# Altium PCB DB42.PcbDoc (part 3 of 8)
Units mil, origin at the board's own origin, x right, y up, seen from the top; angles counter-clockwise.
Board outline 3236.22 x 4456.69 mil, 8 copper layers (Top Layer, MidLayer1, MidLayer2, GND-Layer5, MidLayer3, VCC, MidLayer4, Bottom Layer), stack 62.194 mil thick; 214 components, 470 nets, 1802 pads, 1663 vias.
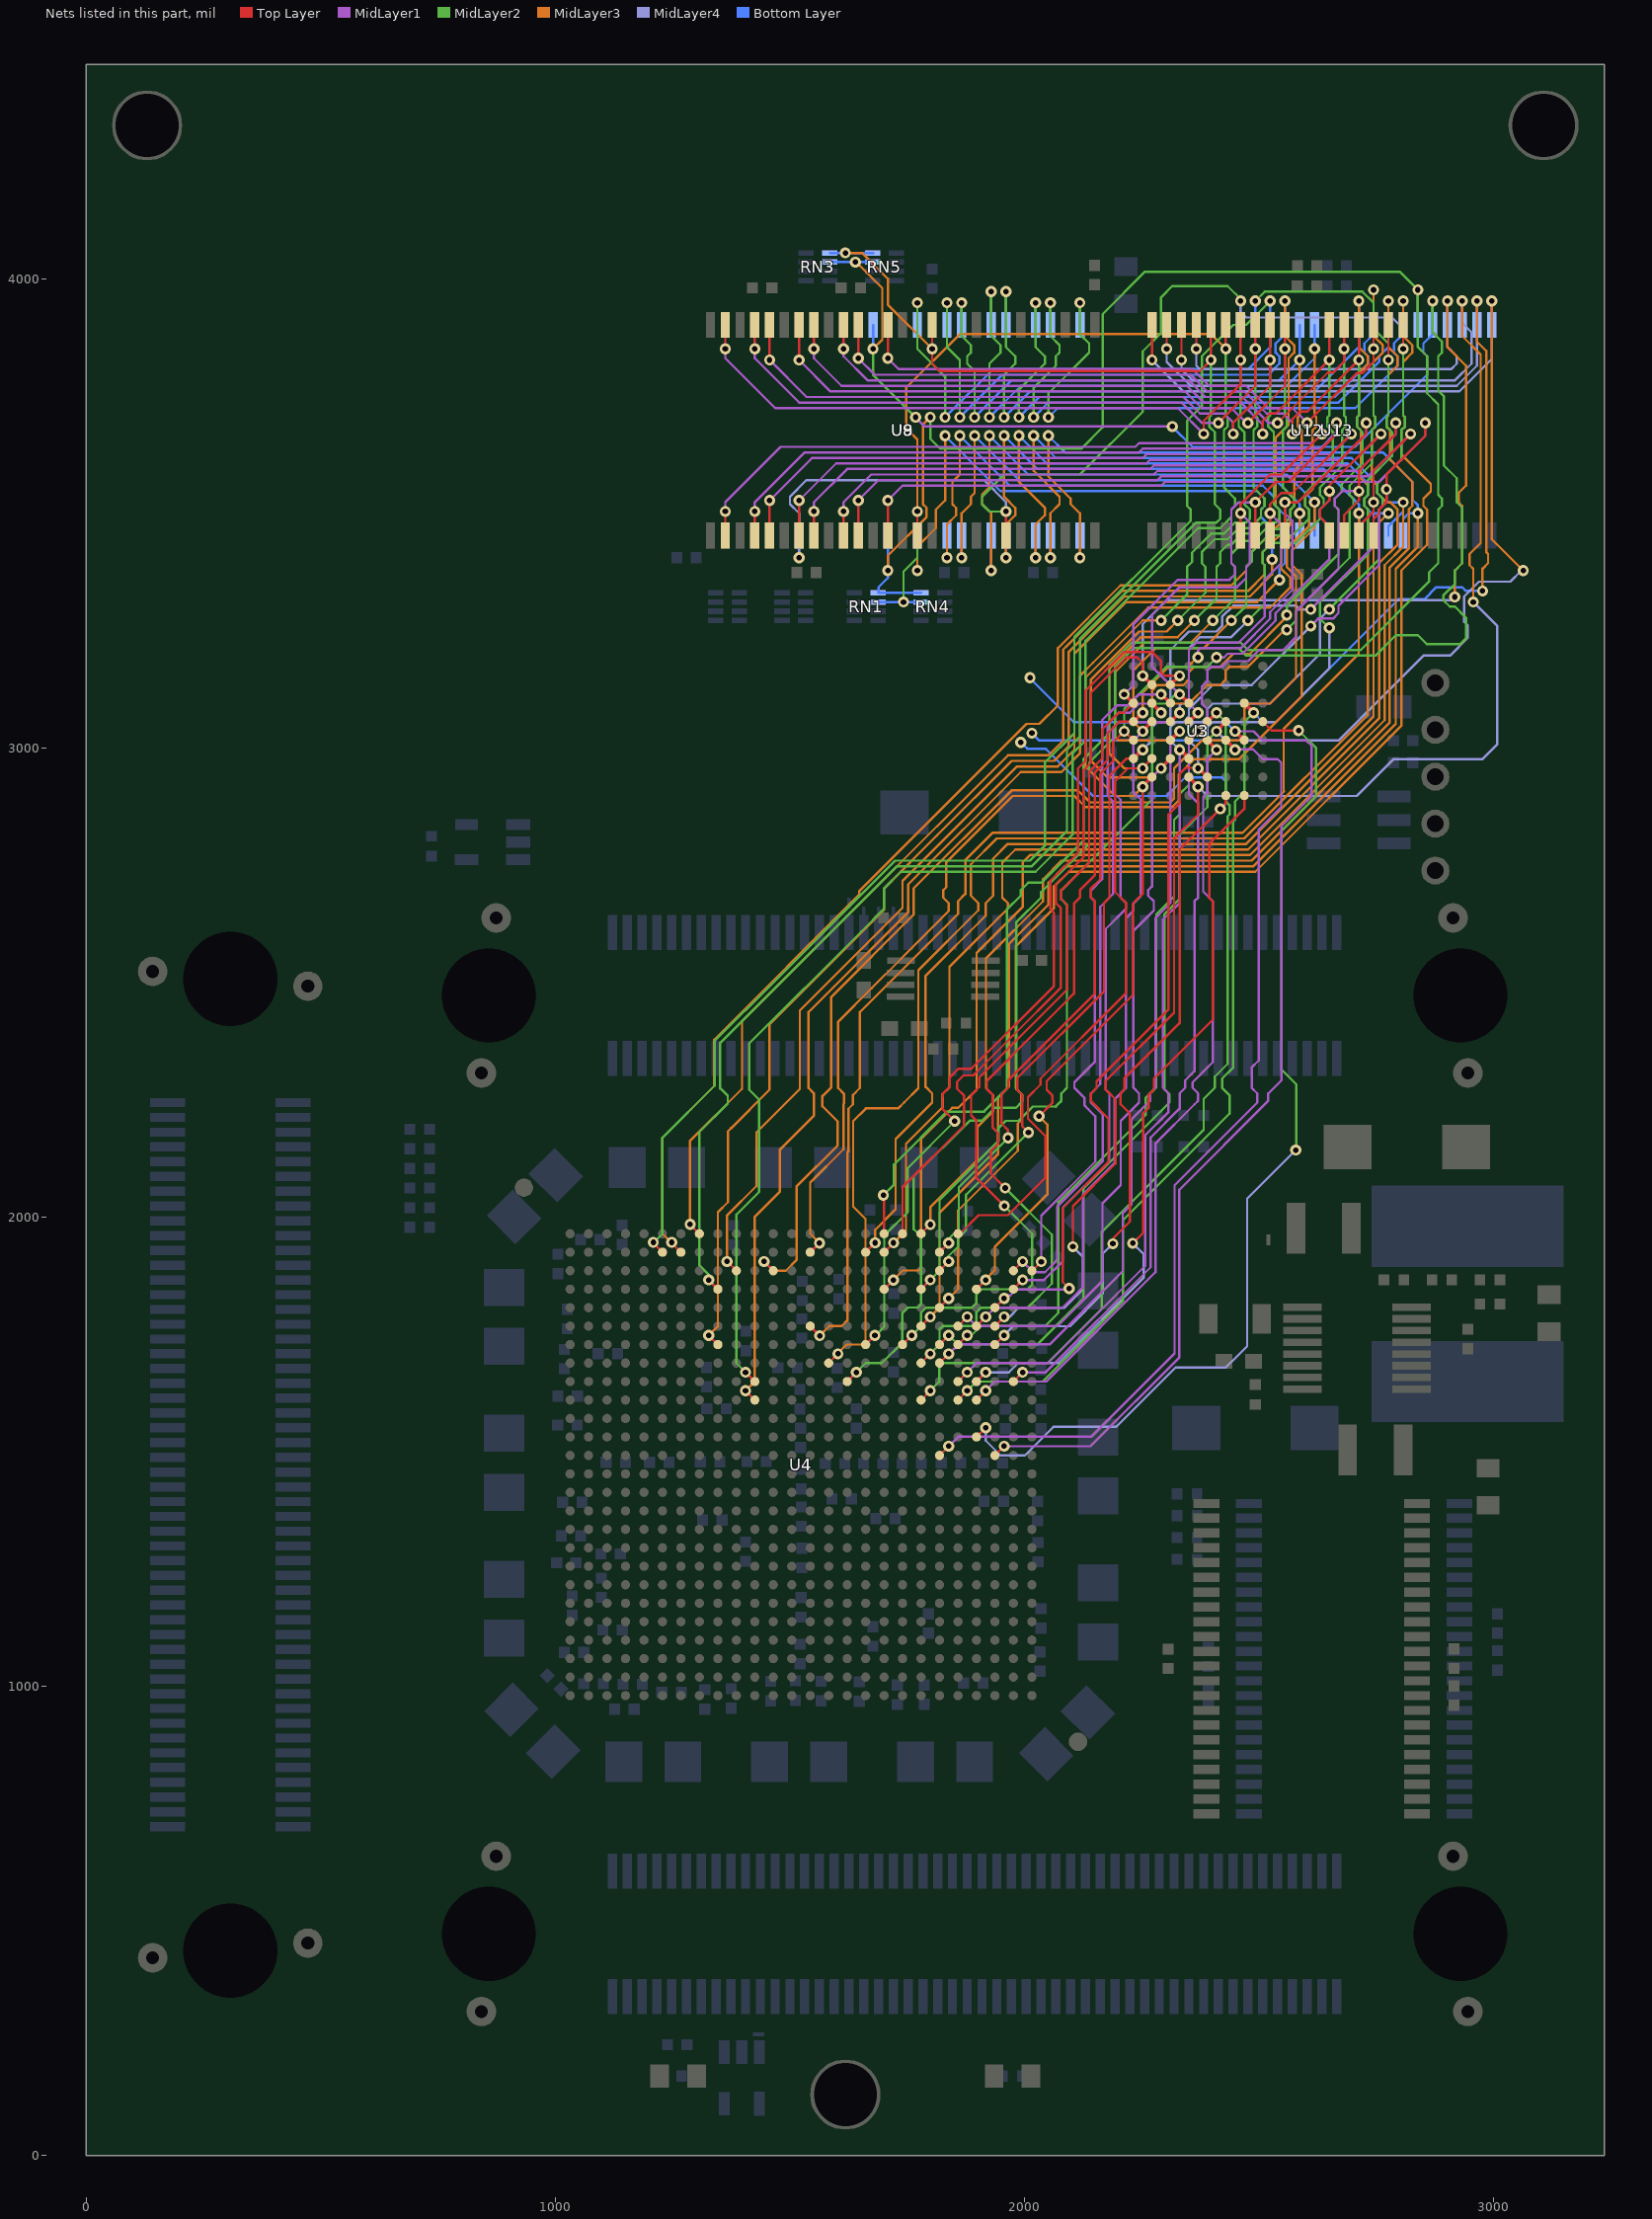
[diagram p9: the nets of this part, all layers, seen from the top]

## Via types
v1: diameter 23.62, hole 11.81, Top Layer to Bottom Layer, 1081 vias
v2: diameter 23.62, hole 11.81, Top Layer to Bottom Layer, tented both sides, 466 vias
v3: diameter 27.56, hole 15.75, Top Layer to Bottom Layer, 116 vias

## Nets (pads, with @x,y where several pads share a name; then routed paths per layer and width w, separated by ;. In a path a pad name is that pad's centre, name@x,y a point inside that pad or via, vN(x,y) a via of type N, cw(c..) or ccw(c..) an arc to the next point about the centre after c; other vN are vias at no path point) (continued)
BUS_A16: U3.D7 U4.E24 U8.21 U9.21 U12.27 U13.27 | length 4892.7
  Top Layer w5: U4.E24@1937.01,1807.09 v1(1956.69,1826.77) ; U8.21@1960.63,3452.76 v2(1960.63,3503.93) ; v1(2095,1848) 2081.5,1861.5 2081.5,2019.5 2179,2117.01 2179,2209.77 2141.73,2247.03 2141.73,2263.78 2153.54,2275.59 2153.54,2289.37 2307.09,2442.91 2307.09,2858.27 2330.71,2881.89 2330.71,2944.88 2343.51,2957.68 v1@2370.08,2957.68 ; v2(2807.09,3850.39) U12.27@2807.09,3901.57
  Top Layer w7.87: v1@2370.57,2957.19 U3.D7@2389.76,2937.99
  MidLayer1 w5: v1(1956.69,1826.77) 1963.11,1833.19 1969.97,1833.19 1982.86,1846.08 2092.88,1846.08 v1@2092.98,1845.98
  MidLayer2 w5: v2(1960.63,3503.93) 1925.2,3503.93 1909.45,3519.68 1909.45,3535.43 1925.2,3551.18 1956.69,3582.68 2118.11,3582.68 2251.97,3716.54 2251.97,3845.28 2291.34,3884.64 2291.34,3960.63 2314.96,3984.25 2433.07,3984.25 2460.63,3956.69 v2(2460.63,3952.76) ; v1(2649.61,3295.28) 2755.91,3401.57 2755.91,3507.87 2763.78,3515.75 2763.78,3531.5 2751.97,3543.31 2751.97,3562.99 2803.15,3614.17 2803.15,3677.17 2811.02,3685.04 2811.02,3704.72 2807.09,3708.66 v2(2807.09,3850.39)
  MidLayer4 w5: v2(1519.68,3405.51) 1519.68,3500 1500,3519.68 1500,3535.43 1535.43,3570.87 1913.38,3570.87 1960.63,3523.63 v2(1960.63,3503.93) ; v1(2370.08,2956.69) 2370.08,2996.06 2350.39,3015.75 2350.39,3043.31 2362.2,3055.12 2377.95,3055.12 2389.76,3066.93 2389.76,3082.68 2401.57,3094.49 2523.62,3094.49 2629.92,3200.79 2629.92,3275.59 v1(2649.61,3295.28) ; v2(2460.63,3952.76) 2460.63,3929.13 2472.44,3917.32 2783.46,3917.32 2807.09,3893.7 v2(2807.09,3850.39)
  Bottom Layer w5: v2(1519.68,3405.51) U9.21@1519.69,3452.76 ; U13.27@2460.63,3901.57 v2(2460.63,3952.76)
BUS_A17: U3.E7 U4.F24 U12.42 U13.42 | length 4073.9
  Top Layer w5: U4.F24@1937.01,1767.72 v1(1956.69,1787.4) ; v1(2103.15,1937.01) 2103.15,2023.32 2194,2114.17 2194,2250.88 2179.92,2264.97 2172.82,2272.06 2172.82,2289.76 2318.9,2435.84 2318.9,2807.09 2370.08,2858.27 v1(2370.08,2917.32) ; v2(2334.64,3826.77) U12.42@2334.64,3901.57
  Top Layer w7.87: U3.E7@2350.39,2937.99 v1(2370.08,2917.32)
  MidLayer3 w5: v2(2933.07,3952.76) 2933.07,3877.95 2972.44,3838.58 2972.44,3437.01 2948.82,3413.39 2948.82,3389.76 2956.69,3381.89 v1(2956.69,3311.02)
  MidLayer4 w5: v1(1956.69,1787.4) 1968.5,1787.4 1987.98,1806.88 2085.23,1806.88 2124.41,1846.06 2124.41,1915.75 v1(2103.15,1937.01) ; v2(2334.64,3826.77) 2334.64,3807.09 2358.27,3783.46 2917.32,3783.46 2952.76,3818.9 2952.76,3885.83 2933.07,3905.51 v2(2933.07,3952.76) ; v1(2370.08,2917.32) 2389.76,2897.64 2708.27,2897.64 2787.01,2976.38 2976.38,2976.38 3007.87,3007.87 3007.87,3259.84 v1(2956.69,3311.02)
  Bottom Layer w5: U13.42@2933.07,3901.57 v2(2933.07,3952.76)
BUS_A18: U3.B3 U4.K22 U12.43 U13.43 | length 4068.5
  Top Layer w5: U4.K22@1858.27,1610.24 v1(1877.95,1629.92) ; v2(2303.15,3850.39) U12.43@2303.15,3901.57
  Top Layer w7.87: U3.B3@2468.5,3095.47 v1@2488.19,3075.79
  MidLayer2 w5: v1(1877.95,1629.92) 1897.64,1649.61 2038.29,1649.61 2210.06,1821.38 2210.06,1993.58 2437.01,2220.53 2437.01,2259.84 2421.26,2275.59 2421.26,2295.28 2444.88,2318.9 2444.88,2673.23 2444.88,2842.52 2448.82,2846.46 2448.82,2885.83 2468.5,2905.51 2468.5,2976.38 2468.5,3055.12 v1(2488.19,3074.8)
  MidLayer3 w5: v2(2964.57,3952.76) 2964.57,3866.14 2984.25,3846.46 2984.25,3417.32 2988.19,3413.39 2988.19,3393.7 2976.38,3381.89 v1(2976.38,3334.65)
  MidLayer4 w5: v2(2303.15,3850.39) 2303.15,3822.83 2354.33,3771.65 2921.26,3771.65 2964.57,3814.96 v2(2964.57,3952.76)
  Bottom Layer w5: v1(2488.19,3074.8) 2507.87,3055.12 2535.43,3055.12 2796.99,3316.68 2852.11,3316.68 2877.95,3342.52 2933.07,3342.52 2940.94,3334.65 v1(2976.38,3334.65) ; U13.43@2964.57,3901.57 v2(2964.57,3952.76)
BUS_A19: U3.C4 U4.G21 U12.44 U13.44 | length 4235
  Top Layer w5: U4.G21@1818.9,1728.35 v1(1838.58,1748.03) ; v2(2271.65,3826.77) U12.44@2271.65,3901.57
  Top Layer w7.87: v1(2409.45,3035.43) U3.C4@2429.13,3056.1
  MidLayer2 w5: v1(1838.58,1748.03) 1858.27,1728.35 2027.48,1728.35 2125.44,1826.3 2125.44,2060.5 2309.45,2244.5 2309.45,2261.23 2298.62,2272.06 2298.62,2645.98 2330.71,2678.06 2330.71,2814.96 2389.76,2874.02 2389.76,3015.75 v1(2409.45,3035.43)
  MidLayer3 w5: v2(2996.06,3952.76) 2996.06,3633.86 2996.06,3444.88 v1(3062.99,3377.95)
  MidLayer4 w5: v2(2271.65,3826.77) 2338.58,3759.84 2926.67,3759.84 2996.06,3829.23 v2(2996.06,3952.76) ; v1(2409.45,3035.43) 2429.13,3015.75 2669.29,3015.75 2850.39,3196.85 2906.85,3196.85 2944.88,3234.88 2944.88,3260.83 2937.01,3268.7 2937.01,3322.83 2968.5,3354.33 3035.43,3354.33 3059.06,3377.95 v1(3062.99,3377.95)
  Bottom Layer w5: U13.44@2996.06,3901.57 v2(2996.06,3952.76)
BUS_A20: U3.D5 U4.K23 U12.28 U13.28 | length 3357.9
  Top Layer w5: U4.K23@1897.64,1610.24 v1(1917.32,1629.92) ; v2(2775.59,3826.77) U12.28@2775.59,3901.57
  Top Layer w7.87: U3.D5@2389.76,3016.73 v1(2409.45,2996.06)
  MidLayer1 w5: v1(1917.32,1629.92) 1937.01,1649.61 2046.16,1649.61 2279.03,1882.48 2279.03,2156.98 2362.44,2240.4 2370.08,2248.03 2370.08,2263.78 2358.27,2275.59 2358.27,2287.4 2401.57,2330.71 2401.57,2673.23 2380.91,2693.9 2380.91,2894.69 2389.76,2903.54 2389.76,2976.38 v1(2409.45,2996.06)
  MidLayer2 w5: v2(2492.13,3952.76) 2511.81,3972.44 2720.47,3972.44 2744.09,3948.82 2744.09,3893.7 2775.59,3862.21 v2(2775.59,3826.77) 2775.59,3708.66 2771.65,3704.72 2771.65,3685.04 2783.46,3673.23 2783.46,3622.05 2732.28,3570.87 2732.28,3539.37 2724.41,3531.5 2724.41,3515.75 2732.28,3507.87 2732.28,3413.39 2629.92,3311.02 2629.92,3275.59 v1(2649.61,3255.91)
  MidLayer4 w5: v1(2409.45,2996.06) 2389.76,3015.75 2389.76,3043.31 2401.57,3055.12 2535.43,3055.12 2649.61,3169.29 v1(2649.61,3255.91)
  Bottom Layer w5: U13.28@2492.13,3901.57 v2(2492.13,3952.76)
BUS_A21: U3.D4 U4.K20 | length 1904.6
  Top Layer w5: U4.K20@1779.53,1610.24 v1(1799.21,1629.92)
  Top Layer w7.87: U3.D4@2389.76,3056.1 v1(2409.45,3074.8)
  MidLayer2 w5: v1(1799.21,1629.92) 1818.52,1649.23 1818.52,1678.76 1828.74,1688.98 2049.21,1688.98 2164.65,1804.41 2164.65,1968.7 2381.89,2185.95 2381.89,2251.97 2405.51,2275.59 2405.51,2299.21 2433.07,2326.77 2433.07,2749.01 2433.07,2854.33 2437.01,2858.27 2437.01,2877.95 2429.13,2885.83 2429.13,2909.45 2429.13,3055.12 v1(2409.45,3074.8)
BUS_A22: U3.C5 U4.N21 | length 2538.3
  Top Layer w5: U4.N21@1818.9,1492.13 v1(1838.58,1511.81)
  Top Layer w7.87: U3.C5@2429.13,3016.73 v1@2448.82,2997.05
  MidLayer1 w5: v1(1838.58,1511.81) 1858.64,1531.87 2142.08,1531.87 2319.88,1709.67 2319.88,2067.91 2496.06,2244.09 2496.06,2263.78 2484.25,2275.59 2484.25,2318.9 2499.36,2334.01 2499.36,2826.05 2547.24,2873.93 2547.24,2968.5 2539.37,2976.38 2507.87,2976.38 2487.2,2997.05 v1@2448.82,2997.05
  Bottom Layer w5: v1(2015.75,3031.5) 2031.5,3015.75 2429.13,3015.75 v1@2447.83,2997.05
  other v1: 2448.82,2996.06
BUS_A23: U3.B8 U4.J23 | length 1604.7
  Top Layer w5: U4.J23@1897.64,1649.61 v1(1917.32,1669.29) ; v1(2230.73,1944.38) 2253.36,1967.02 2253.36,2221.36 2255,2223 ; 2254.75,2223.25 2264.96,2233.46 2264.96,2261.02 2275.59,2271.65 2275.59,2295.27 2401.57,2421.26 2401.57,2673.23 2393.7,2681.1 2393.7,2731.56 ; 2393.7,2716.54 2393.7,2795.28 2468.51,2870.08 U3.B8@2468.5,2898.62
  MidLayer4 w5: v1@1918.3,1669.29 1966.93,1669.29 1986.72,1689.08 2072.15,1689.08 2254.44,1871.37 2254.44,1920.67 v1(2230.73,1944.38)
BUS_A24: U3.C8 U4.G24 | length 2027.6
  Top Layer w5: U4.G24@1937.01,1728.35 v1(1956.69,1748.03) ; v1@2189.4,1944.38 2189.4,1955.21 2224.82,1990.63 2224.82,2220.74 2205,2240.57 2205,2264.05 2212.8,2271.85 2212.8,2295.47 2330.71,2413.39 2330.71,2783.46 2429.14,2881.89 U3.C8@2429.13,2898.62
  MidLayer4 w5: v1(1956.69,1748.03) 1956.69,1748.27 1975.91,1767.48 2096.62,1767.48 2166.54,1837.4 2166.54,1921.52 v1(2188.42,1943.4)
  Bottom Layer w5: v1(1992.13,3011.81) 2006.09,2998.31 2045.43,2998.31 2146.1,2897.64 2303.15,2897.64 2342.52,2937.01 2421.26,2937.01 2429.13,2929.13 2429.13,2881.89 v1(2417.32,2870.08)
BUS_D0: U3.E3 U4.D20 U8.2 U12.7 | length 3891.2
  Top Layer w5: U8.2@1362.21,3452.76 v2(1362.2,3503.93) ; U4.D20@1779.53,1846.46 v1(1799.21,1866.14) ; U12.7@2460.63,3452.76 v1(2460.63,3500) 2460.63,3519.69 2523.62,3582.68 2547.24,3582.68 v2(2633.86,3669.29)
  Top Layer w7.87: v1(2330.71,3114.17) U3.E3@2350.4,3095.48
  MidLayer1 w5: v2(1362.2,3503.93) 1362.2,3523.62 1480.31,3641.73 2236.22,3641.73 2244.09,3649.61 2614.17,3649.61 v2(2633.86,3669.29) ; v1(2330.71,3114.17) 2271.65,3173.23 2271.65,3283.46 2330.71,3342.52 2452.76,3342.52 2472.44,3362.2 2472.44,3385.83 2480.31,3393.7 2480.31,3480.32 v1(2460.63,3500)
  MidLayer2 w5: v1(1799.21,1866.14) 1818.9,1885.83 1818.9,2036.73 1944.38,2162.21 1944.38,2189.4 1960.13,2205.14 1987.68,2205.14 2018.18,2235.65 2066.4,2235.65 ; 2066.57,2235.47 2077.1,2246 2078.74,2247.64 2078.74,2263.78 2090.55,2275.59 2090.55,2665.35 2078.74,2677.17 2078.74,2696.85 2094.49,2712.6 ; 2084.64,2702.76 2271.65,2889.77 2271.65,3086.61 2279.53,3094.49 2302.17,3094.49 2321.85,3114.17 v1(2330.71,3114.17)
BUS_D1: U3.H3 U4.G19 U8.4 U12.8 | length 4174.9
  Top Layer w5: U8.4@1425.2,3452.76 v2(1425.19,3503.93) ; U4.G19@1740.16,1728.35 v1(1759.84,1748.03) ; v1(1957,2024) 1897,2084 1897,2206 1886.22,2216.78 1886.22,2260.24 1903.54,2277.56 1903.54,2297.64 2090.94,2485.04 2090.94,2664.96 2078.74,2677.17 2078.74,2696.85 2137.8,2755.91 2137.8,2949.54 2165.35,2977.1 2165.35,3039.37 2201.28,3075.3 2212.1,3075.3 U3.H3@2232.29,3095.48 ; U12.8@2492.13,3452.76 v1(2492.13,3523.62) 2535.43,3566.93 2562.99,3566.93 2665.35,3669.29 v2(2665.35,3692.91)
  Top Layer w7.87: v1(2212.6,3114.17) U3.H3@2232.29,3095.48
  MidLayer1 w5: v2(1425.19,3503.93) 1425.19,3523.62 1531.5,3629.92 2244.09,3629.92 2251.97,3637.8 2629.92,3637.8 2665.35,3673.23 v2(2665.35,3692.91) ; v1(2212.6,3114.17) 2232.28,3133.86 2232.28,3263.78 2326.77,3358.27 2437.01,3358.27 2448.82,3370.08 2448.82,3385.83 2440.94,3393.7 2440.94,3507.87 2456.69,3523.62 v1(2492.13,3523.62)
  MidLayer2 w5: v1(1759.84,1748.03) 1779.53,1767.72 1779.53,1796.46 1790.16,1807.09 1887.8,1807.09 1897.64,1816.93 1897.64,1835.83 1908.27,1846.46 2006.69,1846.46 2016.14,1855.91 2016.14,1964.86 v1(1957,2024)
BUS_D2: U3.E4 U4.G22 U8.5 U12.9 | length 3924.7
  Top Layer w5: U8.5@1456.69,3452.76 v2(1456.69,3527.55) ; U4.G22@1858.27,1728.35 v1(1877.95,1748.03) ; U12.9@2523.62,3452.76 v1(2523.62,3500) 2523.62,3519.69 2547.24,3543.31 2570.87,3543.31 v2(2696.85,3669.29)
  Top Layer w7.87: U3.E4@2350.39,3056.1 v1(2370.08,3074.81)
  MidLayer1 w5: v2(1456.69,3527.55) 1547.24,3618.11 2251.97,3618.11 2259.84,3625.98 2653.54,3625.98 v2(2696.85,3669.29) ; v1(2370.08,3074.81) 2350.39,3094.5 2350.39,3208.66 2366.14,3224.41 2456.69,3224.41 2511.81,3279.53 2511.81,3358.27 2547.24,3393.7 2547.24,3476.38 v1(2523.62,3500)
  MidLayer2 w5: v1(1877.95,1748.03) 1887.01,1748.03 1906.69,1767.71 2043.77,1767.71 2072.3,1796.25 2072.3,2031.96 2258.28,2217.94 2258.28,2254.34 2280.91,2276.98 2280.91,2645.38 2318.9,2683.37 2318.9,2846.46 2330.71,2858.27 2330.71,2901.57 2350.39,2921.26 2350.39,3055.12 v1(2370.08,3074.81)
BUS_D3: U3.H4 U4.H20 U8.7 U12.10 | length 4178.9
  Top Layer w5: U8.7@1519.69,3452.76 v2(1519.68,3527.56) ; U4.H20@1779.53,1688.98 v1(1799.21,1708.66) ; v1(1959,2062) 1928,2093 1928,2141 1943.4,2156.4 1943.4,2179.56 1932.32,2190.64 1932.32,2260.59 1920.08,2272.83 1920.08,2290.55 1970.67,2341.14 ; 1970.47,2341.34 2087.88,2458.75 2105.53,2476.39 2105.53,2668.52 2118.11,2681.1 2118.11,2696.85 2149.61,2728.35 2149.61,2947.21 2177.17,2974.77 2177.17,3031.5 2201.78,3056.11 U3.H4@2232.28,3056.1 ; U12.10@2555.12,3452.76 v1(2555.12,3523.62) 2582.68,3523.62 2640.75,3581.69 2728.35,3669.29 v2(2728.35,3692.91)
  Top Layer w7.87: U3.H4@2232.28,3056.1 v1@2251.47,3075.3
  MidLayer1 w5: v2(1519.68,3527.56) 1598.43,3606.3 2259.84,3606.3 2267.72,3614.17 2673.23,3614.17 2728.35,3669.29 v2(2728.35,3692.91) ; v1(2370.08,3192.91) 2370.08,3208.66 2374.02,3212.6 2460.63,3212.6 2523.62,3275.59 2523.62,3289.73 2571,3337.11 2571,3484.12 2555.12,3500 v1(2555.12,3523.62)
  MidLayer2 w5: v1(1799.21,1708.66) 1799.21,1709.06 1818.9,1728.74 1818.9,1761.02 1825.59,1767.72 1887.4,1767.72 1897.64,1777.95 1897.64,1797.24 1907.48,1807.09 2007.09,1807.09 2058.27,1858.27 2058.27,1962.73 v1(1959,2062)
  MidLayer3 w5: v1(2251.97,3074.8) 2251.97,3118.11 2255.91,3122.05 2307.09,3173.23 2348.06,3173.23 2367.75,3192.91 v1(2370.08,3192.91)
BUS_D4: U3.H5 U4.B21 U8.8 U12.13 | length 3724.4
  Top Layer w5: U8.8@1551.18,3452.76 v2(1551.18,3503.94) ; U4.B21@1818.9,1925.2 v1(1838.58,1944.88) ; v1(1965.05,2168.74) 1965.05,2185.46 1951.18,2199.33 1951.18,2262.2 1965.35,2276.38 1965.35,2291.31 2149.61,2475.56 2149.61,2673.23 2141.73,2681.1 2141.73,2700.79 2161.42,2720.47 2161.42,2944.88 2188.98,2972.44 2188.98,3011.81 v1(2212.6,3035.43) U3.H5@2232.28,3016.73 ; U12.13@2649.61,3452.76 2649.61,3472.44 2629.92,3492.13 2629.92,3507.87 2649.61,3527.56 v1(2649.61,3547.24) 2649.61,3559.06 v2(2759.84,3669.29)
  MidLayer1 w5: v2(1551.18,3503.94) 1551.18,3523.62 1622.05,3594.49 2267.72,3594.49 2275.59,3602.36 2692.91,3602.36 v2(2759.84,3669.29) ; v1(2409.45,3192.91) 2425.2,3192.91 2433.07,3200.79 2464.57,3200.79 2535.43,3271.65 2535.43,3287.4 2649.61,3401.57 2649.61,3472.44 2629.92,3492.13 2629.92,3507.87 2649.61,3527.56 v1(2649.61,3547.24)
  MidLayer2 w5: v1(1838.58,1944.88) 1838.58,1953.54 1860,1974.96 1860,2063.69 v1(1965.05,2168.74) ; v1(2212.6,3035.43) 2212.6,3082.68 2303.15,3173.23 2389.76,3173.23 v1(2409.45,3192.91)
BUS_D5: U3.E5 U4.J25 U8.10 U12.14 | length 4014.6
  Top Layer w5: U8.10@1614.17,3452.76 v2(1614.17,3503.93) ; U4.J25@1976.38,1649.61 v1(1996.06,1669.29) ; U12.14@2681.1,3452.76 2681.1,3496.06 2712.6,3527.56 v1(2712.6,3547.24) 2712.6,3590.55 2791.34,3669.29 v2(2791.34,3692.91)
  Top Layer w7.87: U3.E5@2350.39,3016.73 v1(2370.08,3035.43)
  MidLayer1 w5: v2(1614.17,3503.93) 1614.17,3523.62 1673.23,3582.68 2275.59,3582.68 2283.46,3590.55 2712.6,3590.55 2791.34,3669.29 v2(2791.34,3692.91) ; v1(1996.06,1669.29) 2045.18,1669.29 2268.98,1893.09 2268.98,2169.6 2330.71,2231.32 2330.71,2263.78 2342.52,2275.59 2342.52,2291.34 2362.2,2311.02 2362.2,2673.23 2370.08,2681.1 2370.08,2720.47 ; 2370.08,2704.72 2370.08,2720.47 ; v1(2712.6,3547.24) 2677.17,3547.24 2661.42,3531.5 2661.42,3515.75 2669.29,3507.87 2669.29,3381.89 2578.74,3291.34 2578.74,3236.22 2551.18,3208.66 2500,3208.66 2476.38,3185.04 2433.07,3185.04 2421.26,3173.23 2397.64,3173.23 2389.76,3165.35 2389.76,3141.73 2377.95,3129.92 2377.95,3094.49 2389.76,3082.68 2389.76,3055.12 v1(2370.08,3035.43) 2350.39,3015.75 2350.39,2901.57 2370.08,2881.89 2370.08,2720.47
BUS_D6: U3.H6 U4.C21 U8.11 U12.15 | length 3777.6
  Top Layer w5: U8.11@1645.67,3452.76 v2(1645.66,3527.55) ; U4.C21@1818.9,1885.83 v1(1838.58,1905.51) ; v1(2008.34,2180.54) 1995.28,2193.61 1995.28,2260.63 1984.41,2271.49 1984.41,2296.22 2169.29,2481.1 2169.29,2669.29 2181.1,2681.1 2181.1,2940.94 2217.52,2977.37 U3.H6@2232.28,2977.36 ; U12.15@2712.6,3452.76 2712.6,3472.44 2744.09,3503.94 v1(2744.09,3523.62) 2744.09,3590.55 v2(2822.83,3669.29)
  Top Layer w7.87: U3.H6@2232.28,2977.36 2251.47,2996.56 v1@2251.97,2997.05
  MidLayer1 w5: v2(1645.66,3527.55) 1688.98,3570.87 2283.46,3570.87 2291.34,3578.74 2732.28,3578.74 v2(2822.83,3669.29) ; v1(2610.24,3295.28) 2744.09,3429.13 v1(2744.09,3523.62)
  MidLayer2 w5: v1(1838.58,1905.51) 1838.58,1917.33 1858.27,1937.01 1858.27,1955.12 1865.55,1962.4 ; 1865.75,1962.21 1875.59,1972.05 1875.59,2047.79 v1(2008.34,2180.54)
  MidLayer4 w5: v1(2251.97,2996.06) 2271.65,3015.75 2271.65,3043.31 2283.46,3055.12 2303.15,3055.12 2311.02,3062.99 2311.02,3208.66 2350.39,3248.03 2409.45,3248.03 2421.26,3259.84 2421.26,3279.53 2444.88,3303.15 2578.74,3303.15 2586.61,3295.28 v1(2610.24,3295.28)
BUS_D7: U3.E6 U4.J22 U8.13 U12.16 | length 4110.9
  Top Layer w5: U8.13@1708.66,3452.76 v2(1708.66,3527.55) ; U4.J22@1858.27,1649.61 v1(1877.95,1669.29) ; U12.16@2744.09,3452.76 2744.09,3488.19 2755.91,3500 2755.91,3507.87 2771.65,3523.62 v1(2771.65,3551.18) 2771.65,3582.68 2854.33,3665.35 v2(2854.33,3692.91)
  Top Layer w7.87: v1@2330.71,2997.05 2331.2,2996.56 U3.E6@2350.39,2977.36
  MidLayer1 w5: v2(1708.66,3527.55) 1740.16,3559.06 2291.34,3559.06 2299.21,3566.93 2755.91,3566.93 2854.33,3665.35 v2(2854.33,3692.91) ; v1(1877.95,1669.29) 1897.64,1688.98 2050.1,1688.98 2257.3,1896.17 2257.3,2174.64 2307.09,2224.43 2307.09,2263.78 2295.28,2275.59 2295.27,2633.86 2330.71,2669.29 2330.71,2700.79 ; 2330.71,2681.1 v1(2330.71,2996.06) v1@2330.71,2997.05 ; v1(2610.24,3259.84) 2625.98,3275.59 2657.48,3275.59 2669.29,3287.4 2669.29,3303.15 2755.91,3389.76 2755.91,3507.87 2771.65,3523.62 v1(2771.65,3551.18)
  MidLayer4 w5: v1(2330.71,2996.06) 2311.02,3015.75 2311.02,3043.31 2322.83,3055.12 2338.58,3055.12 2350.39,3066.93 2350.39,3082.68 2401.57,3133.86 2484.25,3133.86 v1(2610.24,3259.84)
BUS_D8: U3.F3 U4.C26 U8.42 U12.29 | length 3791.8
  Top Layer w5: v2(1708.66,3830.71) U8.42@1708.66,3901.57 ; U4.C26@2016.14,1886.22 U4.C26@2016.14,1886.61 ; U4.C26@2016.14,1887.8 U4.C26@2016.14,1886.61 ; v1(2035.83,1905.12) 2017.32,1886.61 U4.C26@2016.14,1886.61 ; v2(2602.36,3692.91) 2708.17,3798.72 2719.98,3798.72 2744.09,3822.83 v2(2744.09,3850.39) U12.29@2744.09,3901.57
  Top Layer w7.87: v1@2291.34,3115.16 2291.83,3114.67 U3.F3@2311.03,3095.48
  MidLayer1 w5: v2(1708.66,3830.71) 1732.28,3807.09 2358.27,3807.09 2393.7,3771.65 2472.44,3771.65 2519.69,3724.41 2570.87,3724.41 v2(2602.36,3692.91) ; v1@2037,1906.29 v1(2035.83,1905.12) 2035.83,2003.23 2151,2118.4 2151,2215 2136,2230 ; 2136.07,2230.07 2127.45,2238.69 2127.45,2254.44 2106.3,2275.59 2106.3,2287.4 2149.61,2330.71 2149.61,2645.67 2149.61,2673.23 2141.73,2681.1 2141.73,2696.85 2165.35,2720.47 2165.35,3059.06 2196.85,3090.55 2220.47,3090.55 2244.09,3114.17 v1(2291.34,3114.17)
  MidLayer2 w5: v1(2559.06,3251.97) 2578.74,3271.65 2578.74,3291.34 2692.91,3405.51 2692.91,3507.87 2700.79,3515.75 2700.79,3531.5 2692.91,3539.37 2692.91,3559.06 2740.16,3606.3 2740.16,3677.17 2748.03,3685.04 2748.03,3704.72 2744.09,3708.66 v2(2744.09,3850.39)
  MidLayer3 w5: v1(2291.34,3114.17) 2311.02,3094.49 2350.39,3094.49 2389.76,3133.86 2417.32,3133.86 2429.13,3145.67 2429.13,3165.35 2437.01,3173.23 2476.38,3173.23 2555.12,3251.97 v1(2559.06,3251.97)
BUS_D9: U3.G3 U4.C25 U8.44 U12.30 | length 3953.2
  Top Layer w5: v2(1645.67,3830.71) U8.44@1645.67,3901.57 ; U4.C25@1976.38,1885.83 v1(1996.06,1905.51) ; v2(2570.87,3669.29) 2570.87,3700.79 2586.61,3716.54 2602.36,3716.54 v2(2712.6,3826.77) U12.30@2712.6,3901.57
  Top Layer w7.87: U3.G3@2271.65,3095.48 v1(2291.34,3074.8)
  MidLayer1 w5: v2(1645.67,3830.71) 1681.1,3795.28 2354.33,3795.28 2389.76,3759.84 2469,3759.84 2516.24,3712.6 2551.18,3712.6 2570.87,3692.91 v2(2570.87,3669.29) ; v1(1996.06,1905.51) 2018.9,1882.68 2043.68,1882.68 2069.35,1908.35 2069.35,2021.99 2167,2119.64 2167,2218.83 2141.73,2244.09 2141.73,2263.78 2161.42,2283.46 2161.42,2661.42 2188.98,2688.98 2188.98,2724.41 ; 2188.98,2700.79 2188.98,2885.83 2177.17,2897.64 2177.17,3051.18 2200.79,3074.8 2224.41,3074.8 2244.09,3094.49 2271.65,3094.49 v1(2291.34,3074.8)
  MidLayer2 w5: v1(2559.06,3283.46) 2559.06,3303.15 2669.29,3413.39 2669.29,3507.87 2661.42,3515.75 2661.42,3531.5 2676.18,3546.26 2676.18,3562.01 2720.47,3606.3 2720.47,3673.23 2708.66,3685.04 2708.66,3704.72 2712.6,3708.66 v2(2712.6,3826.77)
  MidLayer3 w5: v1(2291.34,3074.8) 2271.65,3094.49 2271.65,3122.05 2283.46,3133.86 2338.58,3133.86 2350.39,3145.67 2350.39,3161.42 2362.2,3173.23 2417.32,3173.23 2444.88,3200.79 2480.31,3200.79 2559.06,3279.53 v1(2559.06,3283.46)
BUS_D10: U3.F4 U4.D25 U8.45 U12.31 | length 3864.5
  Top Layer w5: v2(1614.17,3850.39) U8.45@1614.17,3901.57 ; U4.D25@1976.38,1846.46 v1(1996.06,1866.14) ; v2@2537.4,3694.88 2539.37,3694.88 2541.34,3694.88 2646.65,3800.2 2658.46,3800.2 2681.1,3822.83 v2(2681.1,3850.39) U12.31@2681.1,3901.57
  Top Layer w7.87: U3.F4@2311.02,3056.1 v1(2330.71,3074.8)
  MidLayer1 w5: v2(1614.17,3850.39) 1614.17,3834.65 1665.35,3783.46 2350.39,3783.46 2385.83,3748.03 2464.57,3748.03 2519.69,3692.91 v2(2539.37,3692.91) ; v1(1996.06,1866.14) 2041.73,1866.14 2082.14,1906.55 2082.14,2020.33 2180.87,2119.06 2180.87,2264.02 2173.23,2271.66 2173.23,2614.17 2216.53,2657.48 2216.53,2669.29 2204.72,2681.1 2204.72,2708.66 ; 2204.72,2700.79 2204.72,2889.76 2188.98,2905.51 2188.98,3043.31 2200.79,3055.12 2311.02,3055.12 v1(2330.71,3074.8)
  MidLayer2 w5: v1(2476.38,3271.65) 2511.81,3307.09 2511.81,3389.76 2507.87,3393.7 2507.87,3417.32 2527.56,3437.01 2578.74,3437.01 2629.92,3488.19 2629.92,3507.87 2637.8,3515.75 2637.8,3531.5 2629.92,3539.37 2629.92,3555.12 2677.16,3602.36 2677.16,3677.17 2685.04,3685.04 2685.04,3704.72 2681.1,3708.66 v2(2681.1,3850.39)
  MidLayer4 w5: v1(2330.71,3074.8) 2330.71,3090.55 2334.65,3094.49 2342.52,3094.49 2350.39,3102.36 2350.39,3212.6 2374.02,3236.22 2440.94,3236.22 v1(2476.38,3271.65)
BUS_D11: U3.G4 U4.F23 U8.47 U12.32 | length 4023.3
  Top Layer w5: v2(1551.18,3850.39) U8.47@1551.18,3901.57 ; U4.F23@1897.64,1767.72 v1(1917.32,1787.4) ; v2(2507.87,3669.29) 2507.87,3696.85 2523.62,3712.6 2535.43,3712.6 v2(2649.61,3826.77) U12.32@2649.61,3901.57
  Top Layer w7.87: v1(2251.97,3035.43) U3.G4@2271.65,3056.1
  MidLayer1 w5: v2(1551.18,3850.39) 1551.18,3830.71 1610.24,3771.65 2346.46,3771.65 2381.89,3736.22 2460.63,3736.22 2507.87,3688.98 v2(2507.87,3669.29) ; v1(1917.32,1787.4) 1936.63,1806.71 2081.25,1806.71 2124.46,1849.92 2124.46,2047.58 2192.35,2115.47 2192.35,2251.41 2216.53,2275.59 2216.54,2637.8 2232.28,2653.54 2232.28,2669.29 2248.03,2685.04 2248.03,2889.76 2232.28,2905.51 2232.28,3015.75 v1(2251.97,3035.43)
  MidLayer2 w5: v1(2440.94,3271.65) 2472.44,3303.15 2472.44,3385.83 2484.25,3397.64 2484.25,3417.32 2519.69,3452.76 2570.87,3452.76 2606.3,3488.19 2606.3,3507.87 2598.43,3515.75 2598.43,3543.31 2657.48,3602.36 2657.48,3673.23 2645.67,3685.04 2645.67,3704.72 2649.61,3708.66 v2(2649.61,3826.77)
  MidLayer3 w5: v1(2251.97,3035.43) 2232.28,3055.12 2232.28,3165.35 2279.53,3212.6 2381.89,3212.6 v1(2440.94,3271.65)
BUS_D12: U3.F5 U4.H21 U8.48 U12.35 | length 4274.2
  Top Layer w5: v2(1519.68,3826.77) U8.48@1519.69,3901.57 ; U4.H21@1818.9,1688.98 v1(1838.58,1708.66) ; v2(2476.38,3692.91) 2555.12,3771.65 v2(2555.12,3850.39) U12.35@2555.12,3901.57
  Top Layer w7.87: U3.F5@2311.02,3016.73 v1(2330.71,3035.43)
  MidLayer1 w5: v2(1519.68,3826.77) 1586.6,3759.84 2342.52,3759.84 2377.95,3724.41 2440.94,3724.41 2472.44,3692.91 v2(2476.38,3692.91) ; v1(1838.58,1708.66) 1858.64,1728.72 2053.44,1728.72 2209.41,1884.69 2209.41,2008.67 2227.56,2026.82 2227.56,2207.87 2267.72,2248.03 2267.72,2263.78 2279.53,2275.59 2279.53,2637.79 2311.02,2669.29 2311.02,3015.75 v1(2330.71,3035.43) 2330.22,3035.93 v1@2326.78,3039.37
  MidLayer2 w5: v1(2401.57,3271.65) 2448.82,3318.9 2448.82,3385.83 2440.94,3393.7 2440.94,3413.39 2468.5,3440.94 2488.19,3440.94 2513.78,3466.54 2541.34,3466.54 2547.24,3472.44 2566.93,3492.13 2566.93,3507.87 2574.8,3515.75 2574.8,3531.5 2555.12,3551.18 2551.18,3555.12 2551.18,3677.17 2559.05,3685.04 2559.05,3704.72 2555.12,3708.66 v2(2555.12,3850.39)
  MidLayer3 w5: v1(2330.71,3035.43) 2311.02,3015.75 2200.79,3015.75 2192.91,3023.62 2192.91,3161.42 2255.91,3224.41 2354.33,3224.41 v1(2401.57,3271.65)
BUS_D13: U3.G6 U4.A22 U8.50 U12.36 | length 3876.4
  Top Layer w5: v2(1456.69,3826.77) U8.50@1456.69,3901.57 ; U4.A22@1858.27,1964.57 1862.6,1964.57 1902.16,2004.13 1964.89,2004.13 2044.75,2083.98 2044.75,2172.67 2007.36,2210.06 2007.36,2255.64 2034.25,2282.53 2034.25,2295.28 2208.38,2469.4 2216.54,2477.56 2216.54,2669.29 2192.91,2692.91 2192.91,2838.58 ; 2192.91,2822.83 2192.91,2929.14 2220.47,2956.69 v1(2251.97,2956.69) ; v1@2251.97,2957.68 U3.G6@2271.65,2977.36 ; v2(2444.88,3669.29) 2444.88,3692.91 2523.62,3771.65 v2(2523.62,3826.77) U12.36@2523.62,3901.57
  MidLayer1 w5: v2(1456.69,3826.77) 1535.43,3748.03 2338.58,3748.03 2374.02,3712.6 2425.2,3712.6 2444.88,3692.91 v2(2444.88,3669.29)
  MidLayer2 w5: v1(2362.2,3271.65) 2409.45,3318.9 2409.45,3385.83 2417.32,3393.7 2417.32,3417.32 2433.07,3433.07 2440.94,3433.07 2464.57,3456.69 2484.25,3456.69 2507.87,3480.32 2523.62,3480.32 2535.43,3480.31 2543.31,3488.19 2543.31,3507.87 2531.5,3519.69 2531.5,3673.23 2519.68,3685.04 2519.68,3704.72 2523.62,3708.66 v2(2523.62,3826.77)
  MidLayer3 w5: v1(2251.97,2956.69) 2212.6,2956.69 2181.1,2988.19 2181.1,3169.29 2248.03,3236.22 2326.77,3236.22 v1(2362.2,3271.65)
BUS_D14: U3.F6 U4.F22 U8.51 U12.37 | length 4204.6
  Top Layer w5: v2(1425.2,3850.39) U8.51@1425.2,3901.57 ; U4.F22@1858.27,1767.72 v1(1877.95,1787.4) ; v2(2413.38,3692.91) 2492.13,3771.65 v2(2492.13,3850.39) U12.37@2492.13,3901.57
  Top Layer w7.87: v1@2290.85,2957.19 U3.F6@2311.02,2977.36
  MidLayer1 w5: v2(1425.2,3850.39) 1425.2,3830.71 1519.69,3736.22 2334.65,3736.22 2377.95,3692.91 v2(2413.38,3692.91) ; v1(1877.95,1787.4) 1897.64,1767.72 2069.8,1767.72 2166.38,1864.3 2166.38,2029.61 2205.14,2068.37 2205.14,2205.14 2244.09,2244.09 2244.09,2263.78 2232.28,2275.59 2232.28,2610.24 2275.59,2653.54 2275.59,2673.23 2263.78,2685.04 2263.78,2696.85 2271.65,2704.72 2271.65,2937.01 v1(2291.34,2956.69) v1@2291.34,2957.68
  MidLayer2 w5: v1(2326.77,3271.65) 2385.83,3330.71 2385.83,3385.83 2377.95,3393.7 2377.95,3417.32 2405.51,3444.88 2433.07,3444.88 2456.69,3468.5 2480.31,3468.5 2503.94,3492.13 2503.94,3507.87 2511.81,3515.75 2511.81,3531.5 2492.13,3551.18 2488.19,3555.12 2488.19,3677.17 2496.06,3685.04 2496.06,3704.72 2492.13,3708.66 v2(2492.13,3850.39)
  MidLayer3 w5: v1(2291.34,2956.69) 2271.66,2937.01 2176.99,2937.01 2141.73,2972.27 2141.73,3145.67 2244.09,3248.03 2303.15,3248.03 v1(2326.77,3271.65)
BUS_D15: U3.G7 U4.D23 U8.53 U12.38 | length 3929.4
  Top Layer w5: v2(1362.2,3850.39) U8.53@1362.21,3901.57 ; U4.D23@1897.64,1846.46 v1(1917.32,1866.14) ; v1(2031,2215) 2059.05,2243.05 2059.05,2259.84 2047.24,2271.65 2047.24,2289.76 2231.1,2473.62 2231.1,2668.11 2251.97,2688.98 2251.97,2819.14 ; 2251.97,2814.96 v1(2251.97,2917.32) v1@2251.97,2918.31 ; v2(2381.89,3669.29) 2381.89,3696.85 2460.63,3775.59 v2(2460.63,3826.77) U12.38@2460.63,3901.57
  Top Layer w7.87: v1@2251.97,2918.31 U3.G7@2271.65,2937.99
  MidLayer1 w5: v2(1362.2,3850.39) 1362.2,3830.71 1468.5,3724.41 2326.77,3724.41 v2(2381.89,3669.29)
  MidLayer2 w5: v1(2291.34,3271.65) 2346.46,3326.77 2346.46,3385.83 2357.28,3396.65 2357.28,3416.34 2397.64,3456.69 2425.2,3456.69 2448.82,3480.32 2472.44,3480.32 2480.31,3488.19 2480.31,3507.87 2468.5,3519.69 2468.5,3673.23 2456.69,3685.04 2456.69,3704.72 2460.63,3708.66 v2(2460.63,3826.77)
  MidLayer3 w5: v1(1917.32,1866.14) 1917.32,1867.68 1936.9,1887.26 1936.9,1936.78 2048.69,2048.56 2048.69,2197.31 v1(2031,2215) ; v1(2251.97,2917.32) 2232.28,2897.64 2192.91,2897.64 2129.92,2960.63 2129.92,3149.61 2251.97,3271.65 v1(2291.34,3271.65)
BUS_D16: U4.F20 U9.2 U13.7 | length 3701
  Top Layer w5: U4.F20@1779.53,1767.72 v1(1799.21,1787.4)
  MidLayer3 w5: v1(1799.21,1787.4) 1818.9,1807.09 1818.9,2009.33 1943.4,2133.83 1943.4,2254.4 1967,2278 1967,2581.82 2051.18,2666 2051.18,2712.6 2086.61,2748.03 2488.19,2748.03 2791.34,3051.18 2791.34,3236.22 2791.34,3381.89 2838.58,3429.13 v2(2838.58,3500) ; v2(2051.18,3665.35) 2051.18,3578.74 2098.43,3531.5 2098.43,3519.68 2118.11,3500 v2(2118.11,3405.51)
  Bottom Layer w5: v2(2051.18,3665.35) 2086.61,3629.92 2763.78,3629.92 2826.77,3566.93 2826.77,3529.53 2838.58,3517.72 v2(2838.58,3500) 2818.9,3500 2807.09,3488.19 U13.7@2807.09,3452.76 ; v2(2118.11,3405.51) U9.2@2118.11,3452.76
BUS_D17: U4.D18 U9.4 U13.8 | length 3716.6
  Top Layer w5: U4.D18@1700.79,1846.46 1720.28,1865.94 v1@1720.47,1866.14
  MidLayer3 w5: v1@1720.47,1866.14 1740.55,1886.22 1773.62,1886.22 1779.53,1892.13 1779.53,2166.53 1846,2233 1859,2233 1897.81,2271.81 1897.81,2562.75 1996.06,2661 1996.06,2756.06 2011.65,2771.65 2480.31,2771.65 2767.72,3059.06 2767.72,3389.76 2807.09,3429.13 v2(2807.09,3523.62) ; v2(2019.68,3665.35) 2019.68,3590.55 2074.8,3535.43 2074.8,3519.68 2055.12,3500 v2(2055.12,3405.51)
  Bottom Layer w5: v2(2019.68,3665.35) 2066.93,3618.11 2696.85,3618.11 2751.97,3562.99 2751.97,3543.31 2771.65,3523.62 v2(2807.09,3523.62) 2807.09,3503.94 2775.59,3472.44 U13.8@2775.59,3452.76 ; v2(2055.12,3405.51) U9.4@2055.12,3452.76
  other v1: 1720.47,1865.75
BUS_D18: U4.B17 U9.5 U13.9 | length 3626.3
  Top Layer w5: U4.B17@1661.42,1925.2 v1@1681.1,1944.88
  MidLayer1 w5: v1@1679.92,1944.88 v1@1681.1,1946.06
  MidLayer3 w5: v1(1681.5,1945.28) 1681.5,1972.83 1725.2,2016.53 1725.2,2166.32 1803.15,2244.28 1803.15,2263.78 1789.37,2277.56 1789.37,2514.57 1917.32,2642.52 1917.32,2669.29 1933.07,2685.04 1933.07,2764.07 1964.28,2795.28 2472.44,2795.28 2744.09,3066.93 2744.09,3468.5 v2(2775.59,3500) ; v2(1988.19,3665.35) 1988.19,3566.93 2042.85,3512.27 ; v2(2023.62,3405.51) 2023.62,3476.38 2043.31,3496.06 2043.31,3512.27
  Bottom Layer w5: v2(1988.19,3665.35) 2047.24,3606.3 2688.98,3606.3 2732.28,3562.99 2732.28,3539.37 2724.41,3531.5 2724.41,3515.75 2740.16,3500 2744.09,3500 ; v2(2023.62,3405.51) U9.5@2023.62,3452.76 ; U13.9@2744.09,3452.76 2744.09,3500 ; v2(2775.59,3500) 2744.09,3500
BUS_D19: U4.F14 U9.7 U13.10 | length 3793
  Top Layer w5: U4.F14@1543.31,1767.72 1543.31,1767.32 v1(1563.39,1747.24)
  MidLayer3 w5: v1@1562.99,1747.24 v1(1563.39,1747.24) 1583.86,1767.72 1610.24,1767.72 1622.42,1779.9 1622.42,2138.17 1624.67,2140.42 1624.67,2230.82 1634.42,2240.57 1634.42,2260.25 1649.18,2275.01 1649.18,2436.98 1858.27,2646.06 1858.27,2673.23 1874.02,2688.98 1874.02,2761.02 1931.9,2818.9 2464.57,2818.9 2553.35,2907.68 ; v2(1956.69,3665.35) 1956.69,3535.43 1980.31,3511.81 1980.31,3496.06 1960.63,3476.38 v2(1960.63,3405.51) ; 2552.36,2908.66 2552.36,3040.58 2712.5,3200.72 2712.5,3213.15 ; 2712.51,3213.15 v2(2712.6,3500)
  Bottom Layer w5: v2(1956.69,3665.35) 2027.56,3594.49 2637.8,3594.49 2712.6,3519.69 v2(2712.6,3500) U13.10@2712.6,3452.76 ; v2(1960.63,3405.51) U9.7@1960.63,3452.76
BUS_D20: U4.B14 U9.8 U13.13 | length 3584.5
  Top Layer w5: U4.B14@1543.31,1925.2 v1(1562.99,1944.88)
  MidLayer3 w5: v1(1562.99,1944.88) 1543.31,1964.57 1543.31,2073.93 1614.17,2144.8 1614.17,2240.98 1615.73,2242.54 1615.73,2262.22 1602.94,2275.01 1602.94,2416.7 1673.95,2487.72 1737.28,2551.04 1743.33,2557.1 ; 1743.33,2557.11 1838.58,2652.36 1838.58,2669.29 1826.77,2681.1 1826.77,2696.85 1833.56,2703.64 1833.56,2756.43 1974.77,2897.64 2106.3,2897.64 2129.92,2874.02 2314.96,2874.02 2328.9,2887.95 2328.9,2943.07 2362.2,2976.38 2457.48,2976.38 2590.55,3109.45 2590.55,3370.08 2570.87,3389.76 2570.87,3421.26 2618.11,3468.5 v2(2618.11,3523.62) ; v2(1925.2,3665.35) 1925.2,3555.12 1909.45,3539.37 1909.45,3519.68 1929.13,3500 v2(1929.13,3377.95)
  Bottom Layer w5: v2(1925.2,3665.35) 2007.87,3582.68 2559.06,3582.68 v2(2618.11,3523.62) 2618.11,3500 U13.13@2618.11,3452.76 ; v2(1929.13,3377.95) U9.8@1929.13,3452.76
BUS_D21: U4.K11 U9.10 U13.14 | length 3754.1
  Top Layer w5: v1(1405.51,1629.92) U4.K11@1425.2,1610.24
  MidLayer3 w5: v1(1405.51,1629.92) 1425.2,1649.61 1425.2,2000.79 1478.25,2053.84 1478.25,2143.21 1550.87,2215.83 1550.87,2264.1 1539.96,2275.01 1539.96,2437.2 1751.97,2649.21 1751.97,2708.66 1992.13,2948.82 2078.74,2948.82 2118.11,2988.19 2118.11,3153.54 2145.67,3181.1 2263.78,3299.21 2523.62,3299.21 2566.93,3342.52 2566.93,3362.2 2547.24,3381.89 2547.24,3429.13 2586.61,3468.5 v2(2586.61,3500) ; v2(1866.14,3405.51) 1866.14,3500 1885.83,3519.68 1885.83,3535.43 1893.7,3543.31 v2(1893.7,3665.35)
  Bottom Layer w5: v2(1866.14,3405.51) U9.10@1866.14,3452.76 ; v2(1893.7,3665.35) 1988.19,3570.87 2535.43,3570.87 2586.61,3519.69 v2(2586.61,3500) U13.14@2586.61,3452.76
BUS_D22: U4.C10 U9.11 U13.15 | length 3422.6
  Top Layer w5: v1(1366.14,1905.51) U4.C10@1385.83,1885.83
  MidLayer3 w5: v1(1366.14,1905.51) 1366.14,2003.94 1429.13,2066.93 1429.13,2181.1 1521.26,2273.23 1521.26,2440.56 1740.16,2659.45 1740.16,2716.54 1984.25,2960.63 2070.87,2960.63 2106.3,2996.06 2106.3,3200.79 2216.54,3311.02 2496.06,3311.02 v1(2543.31,3358.27) ; v2(1834.65,3405.51) 1834.65,3476.38 1854.33,3496.06 1854.33,3511.81 1846.46,3519.69 1846.46,3566.93 1862.2,3582.68 v2(1862.2,3665.35)
  Bottom Layer w5: v2(1834.65,3405.51) U9.11@1834.65,3452.76 ; v2(1862.2,3665.35) 1968.5,3559.06 2507.87,3559.06 2535.43,3531.5 2535.43,3515.75 2555.12,3496.06 2555.12,3417.32 2555.12,3393.7 2543.31,3381.89 v1(2543.31,3358.27)
BUS_D23: U4.G9 U9.13 U13.16 | length 3654.5
  Top Layer w5: v1(1326.77,1748.03) U4.G9@1346.46,1728.35
  MidLayer3 w5: v1@1326.77,1747.64 v1@1326.97,1747.83 ; v1(1326.77,1748.03) 1346.46,1767.72 1346.46,1958.27 1346.46,2010.49 1368.13,2032.16 1368.13,2183.09 1374.02,2188.98 ; 1374.63,2189.59 1456.41,2271.37 1456.41,2410.74 1700.79,2655.12 1700.79,2700.79 1812.99,2812.99 1972.44,2972.44 2062.99,2972.44 2094.49,3003.94 2094.49,3204.72 2212.6,3322.83 2480.31,3322.83 2527.56,3370.08 ; v2(1771.65,3377.95) 1771.65,3429.13 1811.02,3468.5 1811.02,3507.87 1830.71,3527.56 v2(1830.71,3665.35) ; 2527.56,3369.83 v2(2527.56,3401.57)
  Bottom Layer w5: v2(1771.65,3377.95) U9.13@1771.65,3452.76 ; v2(1830.71,3665.35) 1948.82,3547.24 2496.06,3547.24 2511.81,3531.5 2511.81,3515.75 2503.94,3507.87 2503.94,3492.13 2523.62,3472.44 U13.16@2523.62,3452.76 2527.56,3448.82 v2(2527.56,3401.57)
BUS_D24: U4.B6 U9.42 U13.29 | length 3940.3
  Top Layer w5: v1@1208.66,1944.88 U4.B6@1228.35,1925.2
  MidLayer2 w5: v1@1208.66,1944.88 1209.46,1945.69 1228.35,1964.57 1228.35,2169.29 1339.64,2280.59 1339.64,2375.86 1404.33,2440.55 ; 1404.72,2440.16 1724.41,2759.84 2011.81,2759.84 2043.31,2791.34 2043.31,2968.5 2106.3,3031.5 2106.3,3236.22 2354.33,3484.25 2354.33,3507.87 2346.46,3515.75 2346.46,3696.85 2377.95,3728.35 2377.95,3834.65 2444.88,3901.57 2472.77,3901.57 v2(2523.62,3952.42) ; v2(1771.65,3948.82) 1771.65,3850.39 1830.71,3791.34 v2(1830.71,3704.72)
  Bottom Layer w5: U9.42@1771.65,3901.57 v2(1771.65,3948.82) ; v2(1830.71,3704.72) 1933.07,3807.09 2476.38,3807.09 2523.62,3854.33 U13.29@2523.62,3901.57 v2(2523.62,3952.42)
  other v1: 1208.79,1946.36
BUS_D25: U4.B7 U9.44 U13.30 | length 3929.3
  Top Layer w5: v1@1248.03,1944.88 U4.B7@1267.72,1925.2 1268.5,1924.41 U4.B7@1268.5,1924.02
  MidLayer2 w5: v2(1834.65,3948.82) 1834.65,3854.33 1862.2,3826.77 v2(1862.2,3704.72)
  MidLayer3 w5: v1@1248.03,1944.88 1247.37,1945.54 1227.97,1964.94 1227.97,2168.92 1288.98,2229.93 1338.58,2279.53 1338.58,2377.95 1647.64,2687.01 1647.64,2694.88 2003.94,3051.18 2031.5,3051.18 2070.87,3090.55 2070.87,3212.6 2204.72,3346.46 2440.94,3346.46 2472.44,3377.95 2472.44,3385.83 2484.25,3397.64 2484.25,3417.32 2490.16,3423.23 2543.31,3476.38 2543.31,3507.87 2535.43,3515.75 2535.43,3661.42 2562.99,3688.98 2562.99,3830.71 2574.8,3842.52 2574.8,3858.27 2555.12,3877.95 v2(2555.12,3952.76)
  Bottom Layer w5: U9.44@1834.65,3901.57 v2(1834.65,3948.82) ; v2(1862.2,3704.72) 1952.76,3795.28 2519.68,3795.28 2543.31,3818.9 2543.31,3834.65 2535.43,3842.52 2535.43,3862.2 U13.30@2555.12,3881.89 ; U13.30@2555.12,3901.57 v2(2555.12,3952.76)
  other v1: 1248.19,1946.36
BUS_D26: U4.A8 U9.45 U13.31 | length 3753.9
  Top Layer w5: v1@1287.99,1983.27 1306.69,1964.57 U4.A8@1307.09,1964.57
  MidLayer2 w5: v2(1866.14,3948.82) 1866.14,3877.95 1885.83,3858.27 1885.83,3842.52 1877.95,3834.65 1877.95,3818.9 1893.7,3803.15 v2(1893.7,3704.72)
  MidLayer3 w5: v1@1288.98,1984.25 1287.99,1985.24 1287.4,1985.83 1287.4,2162.99 1397.64,2273.23 ; 1398.03,2272.83 1398.03,2417.72 1659.45,2679.13 1964.57,2984.25 2051.18,2984.25 2082.68,3015.75 2082.68,3209.65 2089.57,3216.54 2207.68,3334.65 2476.38,3334.65 2511.81,3370.08 2511.81,3389.76 2507.87,3393.7 2507.87,3417.32 2566.93,3476.38 2566.93,3507.87 2574.8,3515.75 2574.8,3590.55 2590.55,3606.3 2590.55,3677.17 2582.68,3685.04 2582.68,3704.72 2586.61,3708.66 v2(2586.61,3826.77)
  Bottom Layer w5: U9.45@1866.14,3901.57 v2(1866.14,3948.82) ; v2(1893.7,3704.72) 1972.44,3783.46 2543.31,3783.46 v2(2586.61,3826.77) U13.31@2586.61,3901.57
  other v1: 1287.4,1984.65
BUS_D27: U4.C12 U9.47 U13.32 | length 4045
  Top Layer w5: v1(1444.88,1905.51) U4.C12@1464.57,1885.83
  MidLayer2 w5: v2(1925.2,3704.72) 1925.2,3818.9 1948.82,3842.52 1948.82,3858.27 1929.13,3877.95 v2(1929.13,3972.44)
  MidLayer3 w5: v1(1444.88,1905.51) 1464.57,1885.83 1491.09,1885.83 1513.96,1908.69 1513.96,2065.14 1601.99,2153.17 1601.99,2203.5 1569.27,2236.22 1569.27,2258.07 1588.18,2276.98 1588.18,2469.28 1763.78,2644.88 1763.78,2700.79 1972.44,2909.45 2114.17,2909.45 2139.61,2884.02 2310.82,2884.02 2318.9,2892.09 2318.9,2956.69 2377.95,3015.75 2456.69,3015.75 2468.5,3027.56 2468.5,3082.68 2480.31,3094.49 2523.62,3094.49 2578.74,3149.61 2578.74,3366.14 2559.06,3385.83 2559.06,3425.2 2606.3,3472.44 2606.3,3507.87 2598.43,3515.75 2598.43,3535.43 2614.17,3551.18 2614.17,3677.17 2622.05,3685.04 2622.05,3704.72 2618.11,3708.66 v2(2618.11,3850.39)
  Bottom Layer w5: v2(1925.2,3704.72) 1992.13,3771.65 2559.05,3771.65 2618.11,3830.71 v2(2618.11,3850.39) U13.32@2618.11,3901.57 ; U9.47@1929.13,3901.57 v2(1929.13,3972.44)
BUS_D28: U4.H15 U9.48 U13.35 | length 4450.6
  Top Layer w5: U4.H15@1582.68,1688.98 v1(1602.36,1708.66)
  MidLayer2 w5: v2(1956.69,3704.72) 1956.69,3795.28 1980.31,3818.9 1980.31,3834.65 1960.63,3854.33 v2(1960.63,3972.44)
  MidLayer3 w5: v1@1601.18,1708.66 1617.52,1725 1620.87,1728.35 1653.54,1728.35 1661.04,1735.85 1661.04,1996.44 1634.77,2022.71 1634.77,2204.5 1661.98,2231.71 1730.53,2231.71 1743.65,2244.83 1773.62,2274.8 1773.62,2525.98 1901.57,2653.94 1901.57,2669.29 1885.83,2685.04 1885.83,2751.83 1941.09,2807.09 2468.5,2807.09 2732.28,3070.87 2732.28,3507.87 2724.41,3515.75 2724.41,3531.49 2732.28,3539.37 2732.28,3559.06 2716.54,3574.8 2716.54,3677.17 2708.66,3685.04 2708.66,3704.72 2712.6,3708.66 2712.6,3799.21 2732.28,3818.9 2732.28,3834.65 2712.6,3854.33 v2(2712.6,3952.76)
  Bottom Layer w5: v2(1956.69,3704.72) 2011.81,3759.84 2618.11,3759.84 2712.6,3854.33 v2(2712.6,3952.76) ; U9.48@1960.63,3901.57 v2(1960.63,3972.44)
BUS_D29: U4.B18 U9.50 U13.36 | length 4135.5
  Top Layer w5: U4.B18@1700.79,1925.2 v1@1720.47,1944.88
  MidLayer2 w5: v2(1988.19,3704.72) 1988.19,3763.78 2043.31,3818.9 2043.31,3834.65 2023.62,3854.33 v2(2023.62,3948.82)
  MidLayer3 w5: v1(1720.87,1945.28) 1747.35,1971.76 1747.35,2156.35 1826,2235 1826,2263 1840,2277 1840,2533.43 1964.57,2658 1964.57,2669.29 1952.76,2681.1 1952.76,2755.76 1980.46,2783.46 2476.38,2783.46 2755.91,3062.99 2755.91,3393.7 2795.28,3433.07 2795.28,3507.87 2779.53,3523.62 2771.65,3523.62 2751.97,3543.31 2751.97,3559.06 2740.16,3570.87 2740.16,3677.17 2748.03,3685.04 2748.03,3704.72 2744.09,3708.66 2744.09,3822.83 2763.78,3842.52 2763.78,3858.27 2744.09,3877.95 v2(2744.09,3976.38)
  Bottom Layer w5: v2(1988.19,3704.72) 2031.5,3748.03 2661.42,3748.03 2732.28,3818.9 2732.28,3834.65 2724.41,3842.52 2724.41,3862.2 2744.09,3881.89 U13.36@2744.09,3901.57 v2(2744.09,3976.38) ; U9.50@2023.62,3901.57 v2(2023.62,3948.82)
BUS_D30: U4.A20 U9.51 U13.37 | length 3958.3
  Top Layer w5: U4.A20@1774.84,1960.6 1779.17,1964.93 v1@1794.53,1980.29
  MidLayer2 w5: v2(2019.68,3704.72) 2019.68,3767.72 2066.93,3814.96 2066.93,3834.65 2074.8,3842.52 2074.8,3858.27 2055.12,3877.95 v2(2055.12,3948.82)
  MidLayer3 w5: v1(1799.21,1984.25) 1799.21,2021.14 1899.12,2121.04 1899.12,2191.37 1933.05,2225.3 1933.05,2259.95 1918,2275 1918,2551.63 2039.37,2673 2039.37,2720.47 2078.74,2759.84 2484.25,2759.84 2778.54,3054.13 2778.54,3384.84 2818.9,3425.2 2818.9,3507.87 2826.77,3515.75 2826.77,3566.93 2779.53,3614.17 2779.53,3677.17 2771.65,3685.04 2771.65,3704.72 2775.59,3708.66 2775.59,3795.28 2795.28,3814.96 2795.28,3834.65 2775.59,3854.33 v2(2775.59,3952.76)
  Bottom Layer w5: v2(2019.68,3704.72) 2051.18,3736.22 2669.29,3736.22 2755.9,3822.83 2755.9,3834.65 2775.59,3854.33 U13.37@2775.59,3901.57 v2(2775.59,3952.76) ; U9.51@2055.12,3901.57 v2(2055.12,3948.82)
BUS_D31: U4.E21 U9.53 U13.38 | length 4150.5
  Top Layer w5: U4.E21@1818.9,1807.09 v1(1838.58,1826.77)
  MidLayer2 w5: v2(2051.18,3704.72) 2051.18,3755.91 2137.8,3842.52 2137.8,3862.2 2118.11,3881.89 v2(2118.11,3948.82)
  MidLayer3 w5: v1(1838.58,1826.77) 1858.27,1846.46 1858.27,2014.25 1985.71,2141.69 1985.71,2199.24 1993,2206.53 1993,2263 1981,2275 1981,2577.01 2062.99,2659 2062.99,2704.72 2094.49,2736.22 2492.12,2736.22 2803.15,3047.25 2803.15,3377.96 2858.27,3433.07 2858.27,3507.87 2850.39,3515.75 2850.39,3531.5 2866.14,3547.24 2866.14,3562.99 2803.15,3625.98 2803.15,3677.17 2811.02,3685.04 2811.02,3704.72 2807.09,3708.66 2807.09,3822.83 2826.77,3842.52 2826.77,3858.27 2807.09,3877.95 v2(2807.09,3952.76)
  Bottom Layer w5: v2(2051.18,3704.72) 2070.87,3724.41 2704.72,3724.41 2795.28,3814.96 2795.28,3834.65 2787.4,3842.52 2787.4,3862.2 2807.09,3881.89 U13.38@2807.09,3901.57 v2(2807.09,3952.76) ; U9.53@2118.11,3901.57 v2(2118.11,3948.82)
BUS_FLASH_NBUSY: U3.A4 U4.M23 | length 2221.9
  Top Layer w5: U4.M23@1897.64,1531.5 v1(1917.32,1551.18) ; U3.A4@2507.87,3056.1 2507.87,3055.91 2519.19,3044.58 ; 2519.12,3044.66 2519.19,3044.58 ; v1(2584.25,3037.01) 2526.77,3037.01 2519.19,3044.58
  MidLayer2 w5: v1(2578.35,2142.91) 2579.53,2144.09 2579.53,2282.68 2547.58,2314.63 2547.58,2823.17 2621.65,2897.24 2621.65,3000 2584.65,3037.01 v1(2584.25,3037.01)
  MidLayer4 w5: v1(1917.32,1551.18) 1917.32,1523.62 1948.82,1492.13 2000.79,1492.13 2061.81,1553.15 2195.67,1553.15 2322.14,1679.62 2429.4,1679.62 2474.71,1724.93 2474.71,2039.28 v1(2578.35,2142.91)
BUS_FLASH_NCS: U3.F2 U4.G17 | length 1931.2
  Top Layer w5: U4.G17@1661.42,1728.35 v1(1681.1,1748.03) ; 1825.2,2256.69 1825.2,2230.71 v1(1851.18,2204.73) ; 1825.59,2256.69 1825.59,2262.6 1840.94,2277.95 1840.94,2298.03 1859.45,2316.54 1887.01,2316.54 2062.99,2492.52 2062.99,2648.82 2055.12,2656.69 2055.12,2716.54 2114.17,2775.59 2114.17,2956.69 2129.92,2972.44 2129.92,3122.05 2212.6,3204.72 2271.65,3204.72 2291.34,3185.04 2291.34,3161.42 2299.21,3153.54 v1(2330.71,3153.54) ; U3.F2@2310.03,3134.85 U3.F2@2311.02,3134.84
  Top Layer w7.87: U3.F2@2311.02,3134.84 v1(2330.71,3153.54)
  MidLayer2 w5: v1(1681.1,1748.03) 1683.09,1748.03 1701.16,1766.11 1701.16,1961 1750.93,2010.77 1750.93,2104.47 v1(1851.18,2204.73)
BUS_FLASH_NRESET: U3.B5 U4.N24 | length 2590.5
  Top Layer w5: U4.N24@1937.01,1492.13 v1(1956.69,1511.81)
  Top Layer w7.87: v1(2448.82,3035.43) U3.B5@2468.5,3016.73
  MidLayer1 w5: v1(1956.69,1511.81) 2140.59,1511.81 2330.2,1701.42 2330.2,2058.55 2519.68,2248.03 2519.68,2263.78 2547.58,2291.67 2547.58,2832.94 2611.81,2897.17 2611.81,3005.12 2601.18,3015.75 2507.87,3015.75 2488.19,3035.43 v1(2448.82,3035.43)
  Bottom Layer w5: v1@2010,3150 2105,3055 2429.25,3055 v1(2448.82,3035.43) v1@2447.57,3035.43
  other v1: 2011.81,3149.61
BUS_NBE0: RN1.6 RN4.7 U4.J11 U8.15 U12.39 | length 4299.2
  Top Layer w5: v1(1405.51,1669.29) U4.J11@1425.2,1649.61 ; U8.15@1771.65,3452.75 v2(1771.65,3503.93) ; v2(2429.13,3850.39) U12.39@2429.13,3901.57
  MidLayer2 w5: v1(1405.51,1669.29) 1385.83,1688.98 1385.83,2005.51 1434.25,2053.94 1434.25,2250.79 1413.38,2271.65 1413.38,2370.08 1652.08,2608.77 1700.79,2657.48 1700.79,2700.79 1736.22,2736.22 2023.62,2736.22 2102.36,2814.96 2102.36,2988.19 2129.92,3015.75 2129.92,3228.35 2370.08,3468.5 2417.32,3468.5 2440.94,3492.13 2440.94,3507.87 2448.82,3515.75 2448.82,3531.5 2425.2,3555.12 2425.2,3677.17 2433.07,3685.04 2433.07,3704.72 2429.13,3708.66 v2(2429.13,3850.39) ; v1(1742.14,3311.02) 1742.14,3376 1771.65,3405.51 v2(1771.65,3503.93)
  MidLayer3 w5: v2(1771.65,3503.93) 1771.65,3657.49 1748.03,3681.1 1748.03,3767.72 1862.2,3881.89 2397.64,3881.89 v2(2429.13,3850.39)
  Bottom Layer w5: RN1.6@1688.58,3311.02 v1(1742.14,3311.02) RN4.7@1779.53,3311.02 RN4.7@1779.92,3311.02
BUS_NBE1: RN3.5 RN5.8 U4.D9 U8.39 U12.40 | length 3836.3
  Top Layer w5: v1(1326.77,1866.14) U4.D9@1346.46,1846.46 ; U8.39@1803.14,3901.57 v2(1803.14,3850.39) 1803.14,3818.9 1818.89,3803.15 2374.02,3803.15 v2(2397.64,3826.77) U12.40@2397.64,3901.57
  MidLayer2 w5: v1(1326.77,1866.14) 1326.77,1878.02 1307.09,1897.71 1307.09,2181.49 1367.46,2241.87 1367.46,2258.53 1351.57,2274.41 1351.57,2371.26 1635.83,2655.51 1728.35,2748.03 2015.75,2748.03 2090.55,2822.83 2090.55,2996.06 2118.11,3023.62 2118.11,3232.28 2366.14,3480.32 2409.45,3480.32 2417.32,3488.19 2417.32,3507.87 2405.51,3519.68 2405.51,3673.23 2393.7,3685.04 2393.7,3704.72 2397.64,3708.66 v2(2397.64,3826.77)
  MidLayer3 w5: v1@1617.92,4055.11 v1(1618.11,4055.11) 1653.55,4055.11 1708.66,4000 1708.66,3944.88 v2(1803.14,3850.39)
  Bottom Layer w5: RN3.5@1586.22,4055.11 v1(1618.11,4055.11) RN5.8@1676.19,4055.12 RN5.8@1677.17,4055.11
BUS_NBE2: RN1.5 RN4.8 U4.A18 U9.15 U13.39 | length 4975.7
  Top Layer w5: v1(1699.21,2046.85) 1700.79,2048.82 1700.79,2046.85 U4.A18@1700.79,1964.57
  MidLayer2 w5: v1(1699.21,2046.85) 1722,2069.64 1722,2112 1835,2225 1913.98,2225 1962.36,2273.38 1962.36,2655.27 1992.13,2685.04 1992.13,2696.85 2007.87,2712.6 2035.43,2712.6 2125.98,2803.15 2125.98,2976.38 2181.1,3031.5 2181.1,3177.17 2228.35,3224.41 2460.63,3224.41 2476.38,3208.66 2716.54,3208.66 2862.2,3354.33 2862.2,3374.02 2881.89,3393.7 2881.89,3507.87 2889.76,3515.75 2889.76,3531.5 2881.89,3539.37 2881.89,3732.28 2858.27,3755.91 2858.27,3834.65 2838.58,3854.33 v2(2838.58,3976.38) 2800,4014.96 2257.09,4014.96 2166.93,3924.8 2166.93,3683.46 2121.26,3637.8 1820.47,3637.8 1799.21,3659.06 v2(1799.21,3704.72)
  MidLayer3 w5: v2(1708.66,3377.95) 1708.66,3409.45 1791.34,3492.13 1791.34,3511.81 1783.46,3519.68 1783.46,3688.98 v2(1799.21,3704.72)
  Bottom Layer w5: U9.15@1708.66,3452.76 v2(1708.66,3377.95) 1708.66,3362.2 1688.98,3342.52 1688.98,3331.1 1688.58,3330.71 RN4.8@1779.53,3330.7 ; U13.39@2838.58,3901.57 v2(2838.58,3976.38)
BUS_NBE3: RN3.6 RN5.7 U4.J16 U9.39 U13.40 | length 5344.6
  Top Layer w5: U4.J16@1622.05,1649.61 v1(1641.73,1669.29)
  MidLayer1 w5: v2(1767.72,3704.72) 1787.4,3685.04 v2(2314.96,3685.04)
  MidLayer2 w5: v1(1641.73,1669.29) 1661.42,1688.98 1695.94,1688.98 1739.78,1732.82 1739.78,1795.73 1751.52,1807.46 1773.02,1807.46 1779.15,1813.59 1779.15,1959.14 ; v2(1677.17,3850.39) 1677.17,3795.28 v2(1767.72,3704.72) ; 1779.07,1959.14 1763.78,1974.44 1763.78,2085.78 1884,2206 1909.87,2206 1936.87,2233 1982,2233 1995,2246 1995,2261 1983,2273 1983,2629 2035.43,2681.43 2035.43,2692.91 2137.8,2795.28 2137.8,2968.5 2192.91,3023.62 2192.91,3173.23 2232.28,3212.6 2456.69,3212.6 2472.44,3196.85 2748.03,3196.85 2791.34,3240.16 2838.58,3240.16 2857.28,3221.46 2929.13,3221.46 2940.94,3233.27 2940.94,3277.56 2917.32,3301.18 2906.5,3301.18 2892.72,3314.96 2892.72,3324.8 2917.32,3349.41 2917.32,3377.95 2933.07,3393.7 2933.07,3511.81 2921.26,3523.62 2921.26,3574.8 2893.7,3602.36 2893.7,3750 2881.89,3761.81 2881.89,3834.65 2889.76,3842.52 2889.76,3866.14 2870.08,3885.83 v2(2870.08,3952.76)
  MidLayer3 w5: v1@1641.54,4035.43 1696.85,3980.12 1696.85,3870.08 v2(1677.17,3850.39)
  Bottom Layer w5: RN3.6@1586.22,4035.43 v1(1639.78,4035.43) RN5.7@1676.19,4035.43 RN5.7@1677.56,4035.43 ; v2(1677.17,3850.39) U9.39@1677.17,3901.57 ; v2(2314.96,3685.04) 2358.27,3641.73 2704.72,3641.73 2858.27,3795.28 2858.27,3834.65 2850.39,3842.52 2850.39,3862.2 2870.08,3881.89 U13.40@2870.08,3901.57 v2(2870.08,3952.76)
BUS_NOE: U3.G2 U4.A19 U12.41 U13.41 | length 3871.2
  Top Layer w5: U4.A19@1740.16,1964.57 1740.16,2064.16 1871.26,2195.26 1871.26,2258.66 1856.3,2273.62 1856.3,2288.19 1870.08,2301.97 1890.55,2301.97 1900.39,2311.81 ; 1899.45,2311.02 1975.33,2386.91 2077.56,2489.14 2077.56,2658.66 2066.93,2669.29 2066.93,2708.66 2125.98,2767.72 2125.98,2952.76 2141.73,2968.5 2141.73,3118.11 2216.54,3192.91 2240.16,3192.91 2251.97,3181.1 v1@2251.97,3154.53 ; v1@2255.91,3150.59 2255.91,3153.54 v1@2255.91,3154.53 ; v2(2366.14,3850.39) U12.41@2366.14,3901.57
  Top Layer w7.87: v1@2251.97,3154.53 2252.46,3154.04 2255.91,3150.59 U3.G2@2271.65,3134.84
  MidLayer3 w5: v2(2901.58,3952.76) 2901.57,3854.33 2940.94,3814.96 2940.94,3559.06 2925.2,3543.31 2925.2,3523.62 2933.07,3515.75 2933.07,3393.7 2917.32,3377.95 v1(2917.32,3321.85) v1@2917.32,3314.96
  MidLayer4 w5: v1(2251.97,3153.54) 2251.97,3263.78 2303.15,3314.96 2907.48,3314.96 v1(2917.32,3321.85) ; v2(2366.14,3850.39) 2366.14,3814.96 2374.02,3807.09 2909.45,3807.09 2921.26,3818.9 2921.26,3834.65 2901.58,3854.33 v2(2901.58,3952.76)
  Bottom Layer w5: U13.41@2901.57,3901.57 v2(2901.58,3952.76)